# Altium PCB PCB_2020-11-19_18-02-21_2026-10-13.pcbdoc (part 2 of 2)
Units mm, origin at the board's own origin, x right, y up, seen from the top; angles counter-clockwise.
Board outline 104.82 x 112.39 mm, 2 copper layers (Top Layer, Bottom Layer); 188 components, 189 nets, 651 pads, 163 vias.
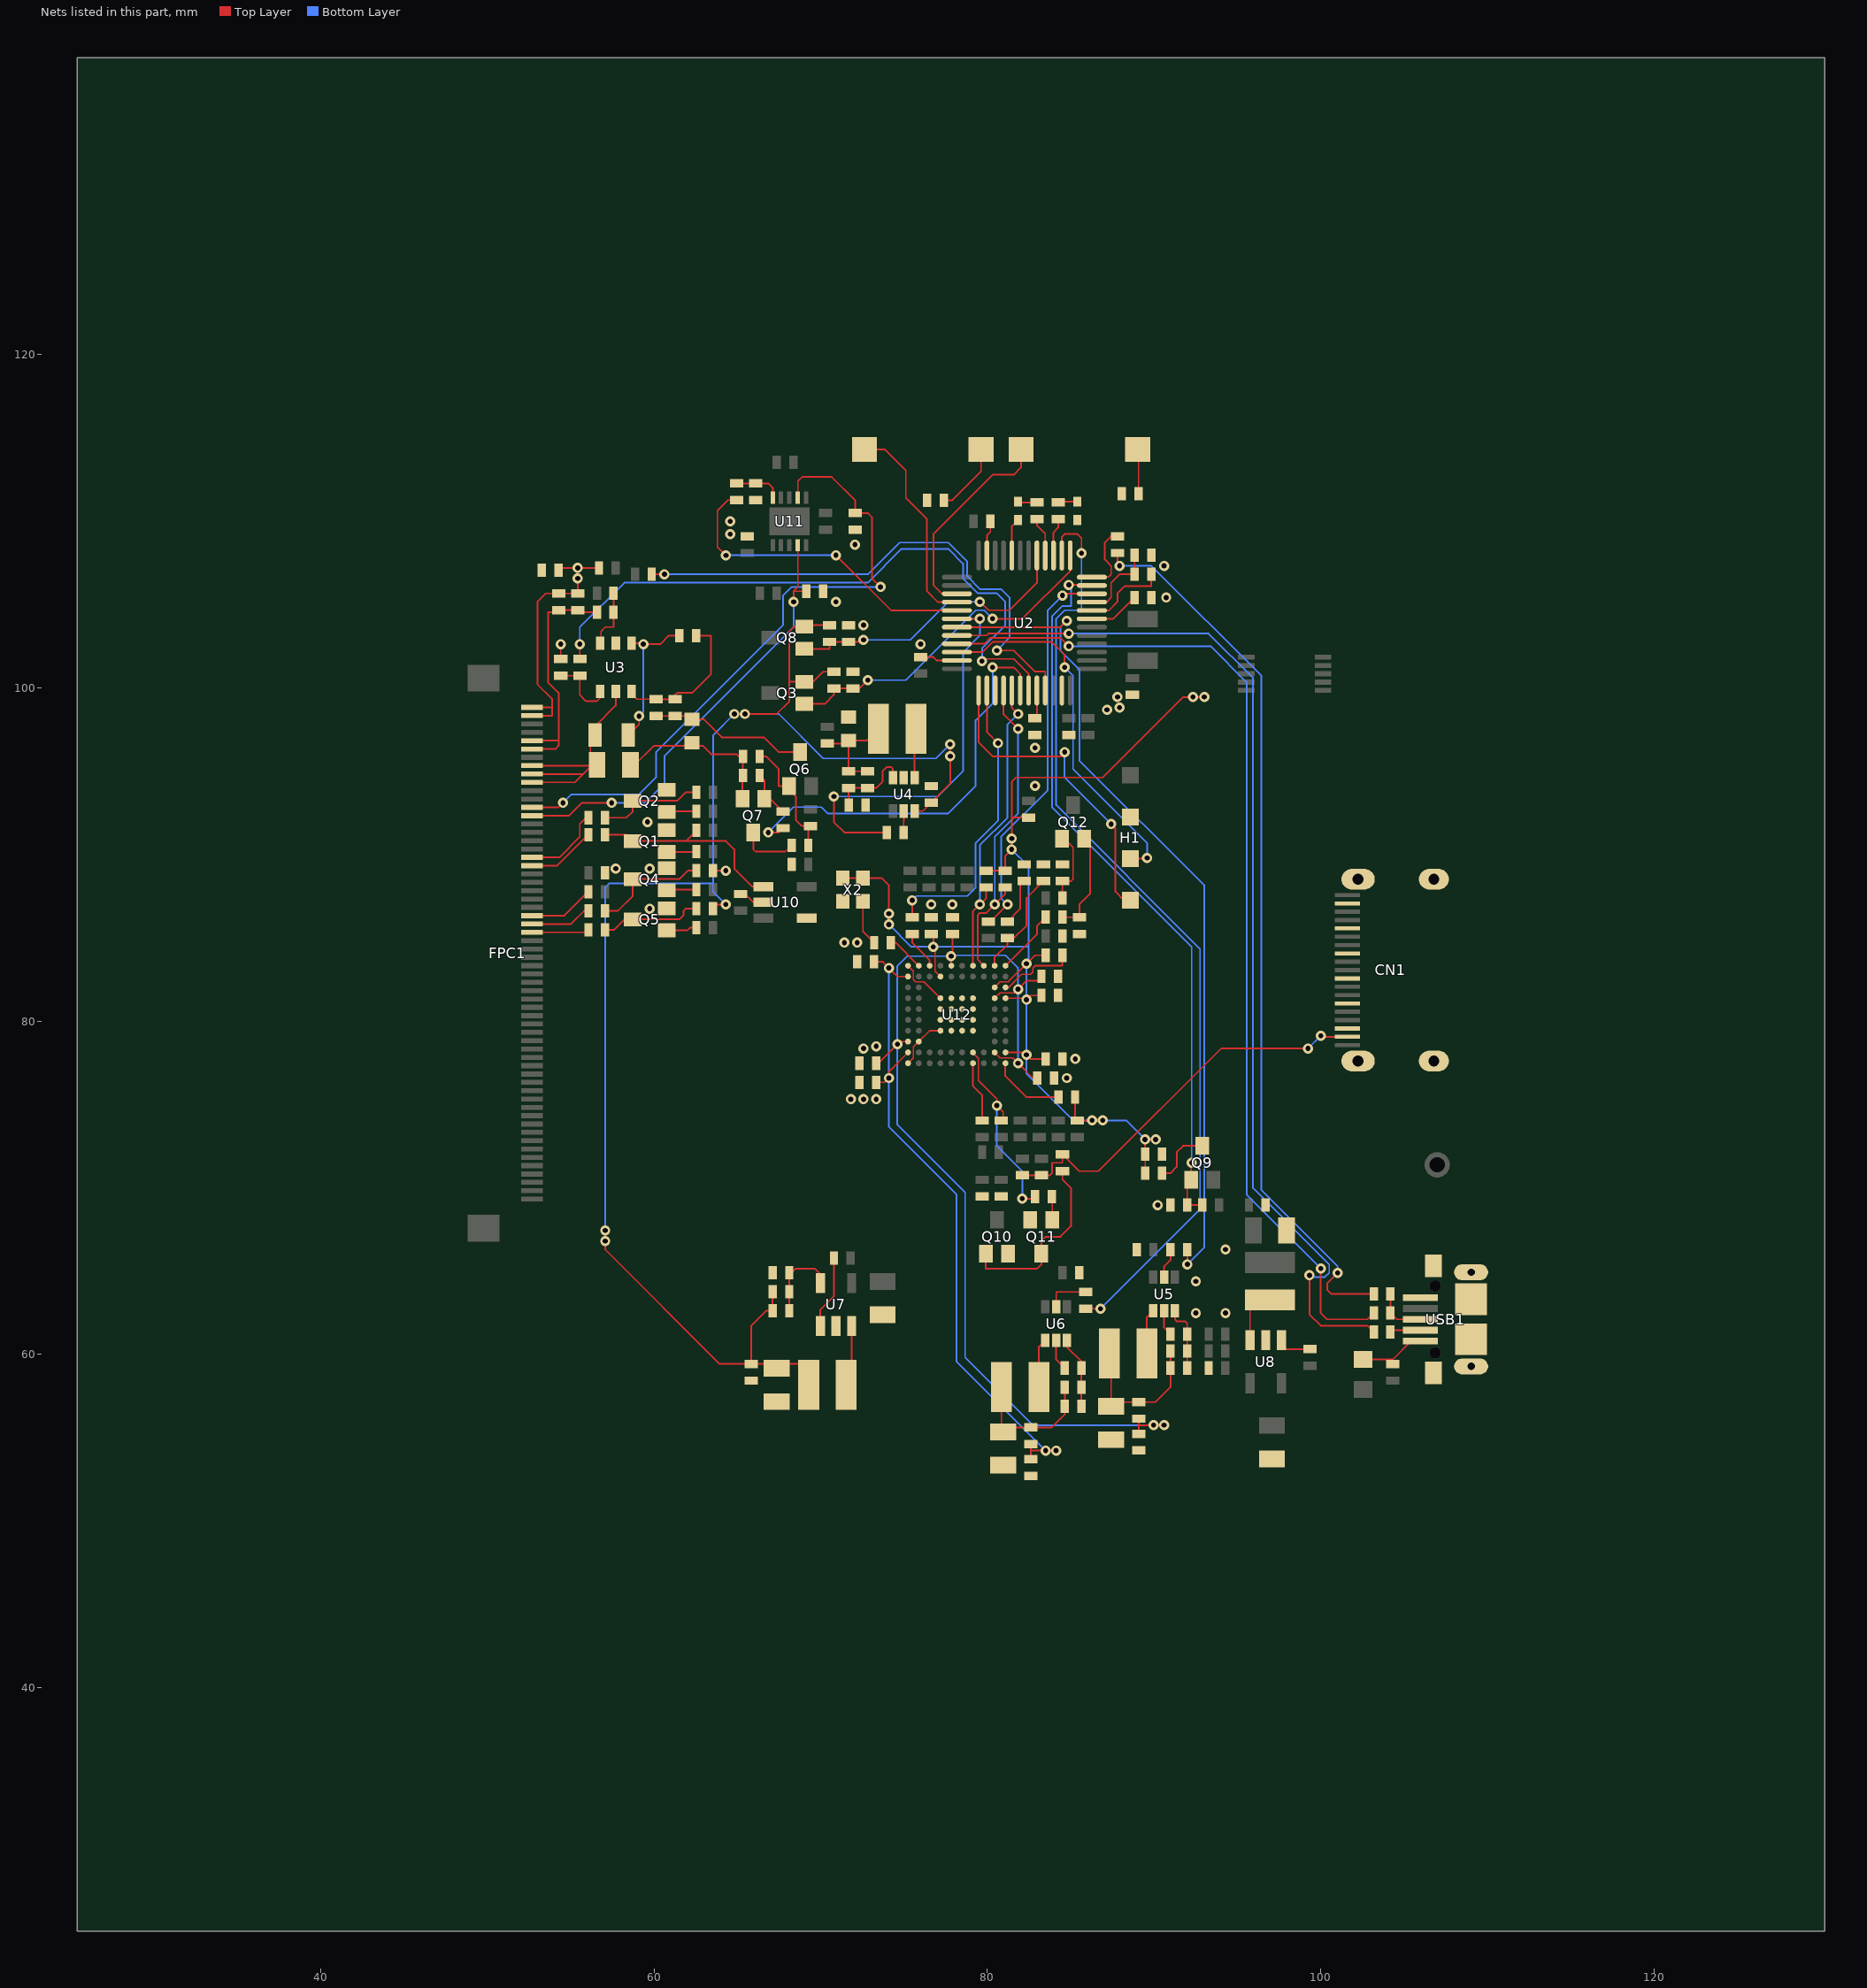
[diagram p2: the nets of this part, all layers, seen from the top]

## Via types
v1: diameter 0.61, hole 0.305, Top Layer to Bottom Layer, tented both sides, 159 vias
v2: diameter 0.5, hole 0.201, Top Layer to Bottom Layer, tented both sides, 4 vias

## Nets (pads, with @x,y where several pads share a name; then routed paths per layer and width w, separated by ;. In a path a pad name is that pad's centre, name@x,y a point inside that pad or via, vN(x,y) a via of type N, cw(c..) or ccw(c..) an arc to the next point about the centre after c; other vN are vias at no path point) (continued)
DISP33: C6.1 C28.1 C29.1 C30.1 L9.2 Q3.2 Q8.2 R8.1 R12.1 R13.1 R33.2 R41.2 U4.3 | length 97.9
  Top Layer w0.1: v1(57.073,67.437) v1(57.073,66.802) 57.073,66.294 63.939,59.428 C30.1@65.836,59.428 ; R13.1@63.542,86.741 63.542,86.995 v1(64.312,86.995) ; R12.1@63.542,89.027 v1(64.312,89.027) ; v1(64.82,98.425) v1(65.455,98.425) 67.36,98.425 68.122,99.187 68.122,100.355 ; C28.1@67.114,62.611 R41.2@67.114,63.754 ; C28.1@67.114,62.611 66.725,62.611 65.836,61.722 C30.1@65.836,59.428 ; L9.2@69.283,58.166 69.283,59.436 67.36,59.436 C29.1@67.36,59.166 67.098,59.428 C30.1@65.836,59.428 ; R33.2@70.535,103.751 69.105,103.751 Q8.2@69.011,103.657 68.401,103.657 68.122,103.378 68.122,100.355 ; R8.1@70.789,100.957 70.146,100.957 69.544,100.355 Q3.2@69.011,100.355 68.122,100.355 ; U4.3@75.63,92.598 76.13,92.598 C6.1@76.631,93.099 77.774,94.242 v1(77.774,95.885) v1(77.756,96.604)
  Bottom Layer w0.1: v1(57.073,67.437) 57.073,88.011 57.327,88.265 63.55,88.265 63.55,89.027 v1(64.312,89.027) ; 63.537,89.027 63.537,87.77 v1(64.312,86.995) ; 63.545,89.027 63.545,97.15 v1(64.82,98.425) ; v1(65.455,98.425) 67.487,98.425 70.154,95.758 76.91,95.758 v1(77.756,96.604)
E1: R34.1 U2.31 | length 50.4
  Top Layer w0.1: U2.31@78.169,103.636 84.382,103.636 v1(84.759,104.013) ; R34.1@91.99,66.294 v1(91.998,65.405)
  Bottom Layer w0.1: v1(84.759,104.013) 84.378,103.632 84.378,102.235 85.521,101.092 85.521,95.631 93.014,88.138 93.014,66.421 v1(91.998,65.405)
E2: R39.1 U2.14 | length 56.9
  Top Layer w0.1: U2.14@84.469,107.937 84.469,109.057 84.632,109.22 85.394,109.22 85.648,108.966 v1(85.648,108.077) ; R39.1@85.902,62.746 v1(86.791,62.738)
  Bottom Layer w0.1: v1(85.648,108.077) 85.648,104.648 84.632,104.648 84.124,104.14 84.124,92.964 92.76,84.328 92.76,68.707 v1(86.791,62.738)
E3: C35.1 Q9.1 R46.1 U2.11 | length 43.9
  Top Layer w0.1: v1(84.886,106.172) 86.233,106.172 U2.11@86.269,106.136 ; v1(92.252,71.501) 92.227,71.476 Q9.1@92.227,70.485 91.99,70.248 91.99,68.961 R46.1@92.895,68.961
  Bottom Layer w0.1: v1(84.886,106.172) 85.013,106.045 85.013,104.902 84.505,104.902 83.87,104.267 83.87,92.837 92.252,84.455 v1(92.252,71.501)
E4: R18.2 U2.30 | length 24.3
  Top Layer w0.1: v1(70.789,93.472) 70.789,91.948 71.424,91.313 R18.2@73.972,91.313 ; U2.30@78.169,104.136 78.173,104.14 v1(79.552,104.14)
  Bottom Layer w0.1: v1(70.789,93.472) 77.012,93.472 78.536,94.996 78.536,102.108 79.552,103.124 v1(79.552,104.14)
E5: R30.2 U2.42 | length 25.3
  Top Layer w0.1: v1(66.852,91.313) 67.479,91.313 R30.2@67.741,91.575 ; v1(80.314,101.219) 81.584,101.219 81.969,100.834 U2.42@81.969,99.836
  Bottom Layer w0.1: v1(66.852,91.313) 68.376,92.837 70.027,92.837 70.408,92.456 77.647,92.456 79.298,94.107 79.298,98.044 80.314,99.06 v1(80.314,101.219)
E6: C3.1 Q3.1 R8.2 U2.13 | length 20.8
  Top Layer w0.1: Q3.1@69.011,99.035 70.256,99.035 70.789,99.568 R8.2@70.789,99.957 C3.1@71.932,99.957 72.321,99.957 v1(72.821,100.457) ; v1(80.314,104.14) 82.092,104.14 84.969,107.017 U2.13@84.969,107.936
  Bottom Layer w0.1: v1(72.821,100.457) 75.107,100.457 79.298,104.648 79.806,104.648 v1(80.314,104.14)
E7: C18.1 Q8.1 R33.1 U2.17 | length 17.9
  Top Layer w0.1: Q8.1@69.011,102.337 70.535,102.337 R33.1@70.535,102.751 C18.1@71.678,102.751 72.448,102.751 v1(72.567,102.87) ; v1(79.552,105.156) 80.06,104.648 81.33,104.648 82.968,106.286 U2.17@82.968,107.937
  Bottom Layer w0.1: v1(72.567,102.87) 75.361,102.87 77.647,105.156 v1(79.552,105.156)
E8: R25.2 U2.43 | length 39.6
  Top Layer w0.1: R25.2@55.549,101.719 v1(55.549,102.616) ; v1(79.679,101.6) 79.806,101.727 81.584,101.727 82.468,100.843 U2.43@82.468,99.835
  Bottom Layer w0.1: v1(55.549,102.616) 55.549,103.632 58.216,106.299 72.821,106.299 74.853,108.331 77.647,108.331 78.536,107.442 78.536,106.553 79.425,105.664 80.568,105.664 81.076,105.156 81.076,103.759 79.679,102.362 v1(79.679,101.6)
E9: R22.2 U2.45 | length 32.2
  Top Layer w0.1: R22.2@59.859,106.807 v1(60.629,106.807) ; v1(80.568,102.235) 81.584,102.235 82.854,100.965 83.469,100.965 U2.45@83.469,99.835
  Bottom Layer w0.1: v1(60.629,106.807) 72.821,106.807 74.726,108.712 77.647,108.712 78.79,107.569 78.79,106.68 79.552,105.918 80.822,105.918 81.33,105.41 81.33,102.997 v1(80.568,102.235)
E10: R31.2 U2.29 | length 19.5
  Top Layer w0.1: v1(64.316,107.944) 63.804,108.457 63.804,110.617 64.447,111.26 R31.2@64.947,111.26 ; v1(70.916,107.95) 74.23,104.636 U2.29@78.169,104.636
  Bottom Layer w0.1: v1@64.317,107.945 v1(70.916,107.95)
F1_1: C66.1 F1.1 USB1.1 | length 4.4
  Top Layer w0.1: C66.1@102.539,59.701 104.317,59.7 F1.1@104.317,59.428 104.317,59.69 105.43,60.803 USB1.1@105.968,60.803
FB1: C7.2 FPC1.1 FPC1.2 R21.1 R23.1 R24.2 | length 16.3
  Top Layer w0.1: FPC1.2@52.681,98.324 53.898,98.323 53.898,99.314 53.009,100.203 53.009,105.156 53.509,105.656 R21.1@54.279,105.656 R23.1@55.422,105.656 v1(55.422,106.553) v1(55.422,107.188) ; FPC1.1@52.681,98.824 53.898,98.824 ; R24.2@54.271,107.061 54.398,107.188 v1(55.422,107.188) ; C7.2@56.7,107.188 v1(55.422,107.188)
FB2: FPC1.5 FPC1.6 R19.1 R21.2 R23.2 | length 14.6
  Top Layer w0.1: FPC1.6@52.681,96.324 54.083,96.324 54.279,96.52 54.279,99.695 53.644,100.33 53.644,104.521 54.144,104.521 R21.2@54.279,104.656 R23.2@55.422,104.656 55.557,104.521 R19.1@56.573,104.521 ; FPC1.5@52.681,96.824 54.279,96.825
GND: C1.2 C2.2 C3.2 C4.2 C6.2 C8.2 C9.2 C10.2 C11.2 C13.2 C16.2 C17.2 C18.2 C19.2 C21.2 C22.2 C23.2 C24.2 C26.2 C27.2 C29.2 C30.2 C31.2 C32.2 C34.2 C35.2 C36.2 C37.2 C38.2 C39.2 C40.2 C41.2 C42.2 C43.2 C44.2 C45.2 C47.1 C48.2 C49.2 C51.2 C52.2 C53.2 C59.2 C60.2 C61.2 C62.2 C63.2 C64.2 C65.2 CN1.2 CN1.5 CN1.8 CN1.11 CN1.14 CN1.17 CN1.20 CN1.21 CN1.22 CN1.23 H1.3 LED1.1 LED2.1 Q1.2 Q2.2 Q4.2 Q5.2 Q7.2 Q10.2 Q11.2 R17.2 R24.1 R26.1 R32.1 R36.1 R37.1 R42.1 R43.1 R59.1 R67.2 R68.1 R70.1 R71.1 U2.8 U2.20 U2.23 U2.35 U2.39 U2.47 U3.2 U4.5 U5.5 U6.5 U7.2 U8.2 U10.4 U12.A10 U12.C9 U12.D4 U12.D5 U12.D6 U12.D7 U12.E4 U12.E5 U12.E6 U12.E7 U12.F4 U12.F5 U12.F6 U12.F7 U12.G4 U12.G5 U12.G6 U12.G7 U12.H1 U12.K10 USB1.5 USB1.SH1 USB1.SH2 USB1.SH3 USB1.SH4 USB1.SH5 USB1.SH6 X2.2 | length 37.2
  Top Layer w0.07: U12.A10@75.236,77.47 75.558,77.792 75.558,78.442 U12.C9@75.886,78.77 ; U12.K10@75.236,83.32 75.549,82.997 75.549,82.494 75.689,82.352 76.202,82.352 U12.G7@77.187,81.369
  Top Layer w0.1: R26.1@54.406,101.719 v1(54.406,102.616) ; C8.2@58.582,95.377 58.851,95.377 59.994,96.52 62.915,96.52 63.423,96.012 64.947,96.012 65.074,95.885 C10.2@65.336,95.885 ; C10.2@65.278,95.885 65.336,95.827 C11.2@65.336,94.742 65.303,94.709 Q7.2@65.303,93.345 ; U12.C9@75.887,78.77 76.537,79.421 U12.D7@77.187,79.421 ; C49.2@75.996,101.846 76.766,101.846 76.976,101.636 U2.35@78.17,101.636 ; U2.23@79.969,107.937 79.969,109.129 80.179,109.339 C47.1@80.179,109.982 ; U12.H1@81.086,82.02 81.264,82.019 82.049,82.804 82.6,82.804 82.727,82.931 82.727,83.185 82.862,83.32 84.497,83.32 C44.2@84.497,83.947 ; U2.20@81.469,107.936 81.469,109.698 LED2.1@81.838,110.067 ; U6.5@84.123,60.85 84.123,59.699 R37.1@84.64,59.182 ; U2.8@86.269,104.636 87.286,104.635 87.807,105.156 87.807,105.664 88.246,106.103 89.831,106.103 C64.2@89.831,106.807 ; U5.5@90.6,62.628 90.6,61.604 R36.1@90.99,61.214
  other v1: 92.506,62.484 94.284,62.484 92.506,64.389 94.284,66.294 90.22,68.961 71.805,75.311 72.567,75.311 73.329,75.311 84.759,76.581 85.267,77.724 72.567,78.359 73.329,78.486 71.424,84.709 72.186,84.709 59.74,86.741 76.631,86.995 77.901,86.995 57.708,89.154 59.74,89.154 59.613,91.948 82.854,94.107 82.854,96.393 87.172,98.679 87.934,98.806 87.807,99.441 75.996,102.616 72.567,103.759 70.916,105.156 90.728,105.41 90.601,107.315 72.059,108.585 64.566,109.22 64.566,109.982
HPD0: R56.2 R60.1 U12.B4 | length 11.9
  Top Layer w0.07: U12.B4@79.125,78.12 79.448,77.772 79.448,76.431 80.568,75.311 v1(80.568,74.93)
  Top Layer w0.1: v1(80.568,74.93) 80.949,74.549 80.949,74.16 R60.1@80.822,74.033 ; v1(82.092,69.342) 82.735,69.342 R56.2@82.862,69.469
  Bottom Layer w0.1: v1(80.568,74.93) 80.568,72.517 82.092,70.993 v1(82.092,69.342)
HPD1: R58.2 U12.A4 | length 3.7
  Top Layer w0.1: U12.A4@79.126,77.47 79.126,76.118 79.679,75.565 R58.2@79.679,74.033
I2C_SCL: R62.1 U2.41 U12.K4 | length 19
  Top Layer w0.1: U12.K4@79.125,83.32 79.125,86.568 v1(79.552,86.995) 79.933,87.376 R62.1@79.933,88.019 ; U2.41@81.469,99.836 81.469,98.794 v1(81.838,98.425)
  Bottom Layer w0.1: v1(79.552,86.995) 79.552,90.551 81.203,92.202 81.203,97.79 v1(81.838,98.425)
I2C_SDA: R61.1 U2.40 U12.K3 | length 19.5
  Top Layer w0.1: U12.K3@79.786,83.32 79.425,83.68 79.425,86.36 79.552,86.487 79.93,86.487 v1(80.441,86.995) 81.076,87.63 R61.1@81.076,88.019 ; U2.40@80.969,99.836 80.969,98.405 v1(81.838,97.536)
  Bottom Layer w0.1: v1(80.441,86.995) 80.441,91.059 81.838,92.456 v1(81.838,97.536)
INT: C50.2 U2.10 | length 23.6
  Top Layer w0.1: C50.2@80.06,85.971 80.179,85.971 v1(81.203,86.995) ; v1(84.505,105.537) 84.604,105.636 U2.10@86.269,105.636
  Bottom Layer w0.1: v1(81.203,86.995) 80.822,87.376 80.822,91.059 83.616,93.853 83.616,104.648 v1(84.505,105.537)
L2_1: C4.1 C5.1 L1.2 L2.1 R16.1 | length 6.4
  Top Layer w0.1: L1.2@70.408,96.655 71.497,96.655 C4.1@71.678,96.836 ; C5.1@72.821,94.988 R16.1@71.678,94.988 C4.1@71.678,96.836 ; L2.1@73.474,97.536 72.774,96.836 C4.1@71.678,96.836
L3_1: D1.2 L3.1 U3.1 | length 8.9
  Top Layer w0.1: D1.2@58.454,97.155 59.105,97.806 v1(59.105,98.298) ; U3.1@58.658,102.667 59.308,102.667 v1(59.359,102.616) 60.375,102.616 60.883,103.124 L3.1@61.526,103.124
  Bottom Layer w0.1: v1(59.105,98.298) 59.359,98.552 v1(59.359,102.616)
L5_1: L5.1 U5.4 | length 2.7
  Top Layer w0.1: L5.1@89.567,60.071 89.567,62.245 U5.4@89.949,62.628
L6_1: C20.2 C21.1 L5.2 L6.1 R35.1 | length 9.4
  Top Layer w0.1: L5.2@87.317,60.071 87.426,59.962 C21.1@87.426,56.88 87.688,57.142 L6.1@89.077,57.142 90.085,57.142 90.99,58.047 R35.1@90.99,59.182 ; R35.1@90.99,59.182 C20.2@90.99,60.198
L8_2: C24.1 C25.2 L7.1 L8.2 R38.1 | length 8.6
  Top Layer w0.1: L8.2@80.84,58.039 80.84,55.357 C24.1@80.949,55.356 ; C24.1@80.949,55.356 81.211,55.618 L7.1@82.6,55.618 83.862,55.618 84.64,56.396 R38.1@84.64,56.896 ; R38.1@84.64,56.896 C25.2@84.64,58.039
L10_1: L10.1 U8.3 | length 3.6
  Top Layer w0.1: U8.3@95.757,60.858 95.757,63.264 L10.1@96.951,63.264
LED2_2: LED2.2 R73.2 | length 1.2
  Top Layer w0.1: LED2.2@81.838,111.167 81.888,111.117 R73.2@82.981,111.117
PCKIN: C46.2 U12.K1 | length 3.9
  Top Layer w0.1: U12.K1@81.076,83.32 82.981,85.225 82.981,85.717 C46.2@83.497,86.233
PFIL: C48.1 R66.1 U12.K2 | length 6.5
  Top Layer w0.1: U12.K2@80.426,83.32 80.426,83.805 81.203,84.582 R66.1@81.203,84.963 ; R66.1@81.203,84.971 81.592,84.971 82.346,85.725 82.346,87.384 C48.1@83.362,88.4
PWR: CN1.18 R51.1 R54.1 R55.2 | length 24.5
  Top Layer w0.1: R51.1@82.092,70.747 R54.1@83.235,70.747 ; R54.1@83.235,70.739 83.743,70.739 83.87,70.866 83.87,71.501 84.505,71.501 R55.2@84.505,72.001 85.513,70.993 86.664,70.993 94.03,78.359 v1(99.237,78.359) ; v1(99.999,79.121) 100.062,79.058 CN1.18@101.59,79.058
  Bottom Layer w0.1: v1(99.237,78.359) v1(99.999,79.121)
Q4_1: Q4.1 R14.1 | length 1.8
  Top Layer w0.1: Q4.1@60.756,87.859 60.756,87.884 R14.1@62.542,87.884
Q4_3: Q4.3 R10.2 R12.2 | length 7.1
  Top Layer w0.1: R10.2@57.065,86.614 57.835,86.614 58.724,87.503 Q4.3@58.724,88.519 61.518,88.519 62.026,89.027 R12.2@62.542,89.027
Q5_1: Q5.1 R15.1 | length 1.8
  Top Layer w0.1: Q5.1@60.756,85.446 62.001,85.446 62.153,85.598 R15.1@62.542,85.598
Q5_3: Q5.3 R11.2 R13.2 | length 6.2
  Top Layer w0.1: R11.2@57.065,85.471 57.581,85.471 58.216,86.106 Q5.3@58.724,86.106 61.518,86.106 61.772,86.36 61.772,86.614 61.899,86.741 R13.2@62.542,86.741
Q6_3: C9.1 L4.2 Q6.3 R27.2 | length 9.5
  Top Layer w0.1: R27.2@60.121,98.306 L4.2@61.264,98.306 62.084,98.306 C9.1@62.281,98.109 62.977,98.109 64.058,97.028 66.598,97.028 67.487,96.139 Q6.3@68.757,96.139
Q7_3: Q7.3 R29.2 | length 3.5
  Top Layer w0.1: Q7.3@65.963,91.313 65.963,90.297 66.09,90.17 67.876,90.17 R29.2@68.257,90.551
Q10_1: Q10.1 Q11.3 R55.1 | length 11.4
  Top Layer w0.1: Q10.1@79.908,66.039 79.908,65.151 82.981,65.151 83.235,65.405 Q11.3@83.235,66.04 83.235,66.802 83.489,67.056 84.378,67.056 85.013,67.691 85.013,69.977 84.505,70.485 R55.1@84.505,71.001
Q11_1: Q11.1 R56.1 | length 1.4
  Top Layer w0.1: R56.1@83.862,69.469 83.895,69.435 Q11.1@83.895,68.072
R1_1: FPC1.19 R1.1 | length 4.8
  Top Layer w0.1: FPC1.19@52.681,89.824 54.315,89.825 55.549,91.059 55.549,91.821 55.93,92.202 R1.1@56.065,92.202
R2_1: FPC1.20 R2.1 | length 4.2
  Top Layer w0.1: FPC1.20@52.681,89.324 54.195,89.324 56.057,91.186 R2.1@56.065,91.186
R3_2: Q2.3 R1.2 R3.2 | length 6.5
  Top Layer w0.1: R1.2@57.065,92.202 58.343,92.202 58.724,92.583 Q2.3@58.724,93.218 61.391,93.218 61.899,93.726 R3.2@62.542,93.726
R4_2: Q1.3 R2.2 R4.2 U10.1 | length 12.7
  Top Layer w0.1: R2.2@57.065,91.186 58.343,91.186 Q1.3@58.724,90.805 61.907,90.805 R4.2@62.542,91.44 ; 61.653,90.805 64.312,90.805 64.82,90.297 64.82,89.154 65.902,88.072 U10.1@66.621,88.072
R5_1: Q2.1 R5.1 | length 1.8
  Top Layer w0.1: Q2.1@60.756,92.558 60.781,92.583 R5.1@62.542,92.583
R6_1: Q1.1 R6.1 | length 1.8
  Top Layer w0.1: Q1.1@60.756,90.145 62.516,90.145 R6.1@62.542,90.17
R7_1: R7.1 U10.2 | length 1.6
  Top Layer w0.1: R7.1@65.201,87.622 65.463,87.622 65.963,87.122 U10.2@66.573,87.122
R9_1: FPC1.26 R9.1 | length 4
  Top Layer w0.1: FPC1.26@52.681,86.324 54.624,86.324 56.057,87.757 R9.1@56.065,87.757
R10_1: FPC1.27 R10.1 | length 3.7
  Top Layer w0.1: FPC1.27@52.681,85.824 55.013,85.824 55.803,86.614 R10.1@56.065,86.614
R11_1: FPC1.28 R11.1 | length 3.4
  Top Layer w0.1: FPC1.28@52.681,85.324 55.918,85.324 R11.1@56.065,85.471
R18_1: R18.1 U4.2 | length 1.3
  Top Layer w0.1: R18.1@74.972,91.313 U4.2@74.98,92.598
R20_2: R19.2 R20.2 U3.3 | length 3.6
  Top Layer w0.1: U3.3@56.758,102.667 56.819,102.728 56.819,103.378 57.073,103.632 57.573,103.64 57.573,104.521 R20.2@57.573,105.664
R26_2: R25.1 R26.2 U3.4 | length 4.1
  Top Layer w0.1: R26.2@54.406,100.719 R25.1@55.549,100.719 55.549,99.568 55.93,99.187 56.565,99.187 56.758,99.38 U3.4@56.758,99.771
R27_1: L3.2 L4.1 R27.1 U3.6 | length 9
  Top Layer w0.1: U3.6@58.658,99.771 58.658,99.634 58.978,99.314 R27.1@60.121,99.306 L4.1@61.264,99.306 61.264,99.568 61.391,99.695 62.28,99.695 63.423,100.838 63.423,103.124 L3.2@62.526,103.124
R29_1: C10.1 Q6.1 R28.1 R29.1 | length 7.5
  Top Layer w0.1: C10.1@66.336,95.885 66.725,95.885 67.487,95.123 67.487,94.107 Q6.1@68.097,94.107 68.097,93.878 68.503,93.472 68.503,92.075 68.876,91.702 R28.1@69.392,91.702 69.257,91.567 R29.1@69.257,90.551
R30_1: C11.1 Q7.1 R30.1 | length 3
  Top Layer w0.1: C11.1@66.336,94.742 66.623,94.454 Q7.1@66.623,93.345 66.971,93.345 R30.1@67.741,92.575
R32_2: R31.1 R32.2 U11.10 | length 2.9
  Top Layer w0.1: R31.1@64.947,112.26 R32.2@66.09,112.26 66.86,112.26 67.131,111.989 U11.10@67.131,111.404
R34_2: R34.2 U5.2 | length 1.8
  Top Layer w0.1: U5.2@90.601,64.628 90.601,65.278 90.99,65.667 R34.2@90.99,66.294
R36_2: C20.1 R35.2 R36.2 U5.6 | length 4.1
  Top Layer w0.1: U5.6@91.25,62.628 91.249,62.116 91.363,61.976 91.871,61.976 91.99,61.857 91.99,61.214 C20.1@91.99,60.16 ; R35.2@91.99,59.182 C20.1@91.99,60.198
R45_2: R45.2 U8.1 | length 2.3
  Top Layer w0.1: U8.1@97.637,60.858 97.637,60.317 R45.2@99.364,60.317
R47_2: Q9.3 R47.2 | length 3.6
  Top Layer w0.1: R47.2@90.466,70.866 90.982,70.866 91.363,71.247 91.363,72.136 91.744,72.517 Q9.3@92.887,72.517
R63_1: R63.1 U12.K8 | length 2.3
  Top Layer w0.1: R63.1@75.488,85.225 75.488,84.709 76.526,83.671 U12.K8@76.526,83.32
R64_1: R64.1 U12.K9 | length 2.2
  Top Layer w0.1: R64.1@74.21,84.709 74.487,84.709 U12.K9@75.876,83.32
R64_2: R64.2 X2.3 | length 2.8
  Top Layer w0.1: X2.3@72.532,87.184 72.531,85.387 R64.2@73.21,84.709
R65_2: C52.1 Q12.1 R65.2 | length 4.5
  Top Layer w0.1: Q12.1@84.48,90.932 84.632,90.932 85.14,90.424 85.14,88.519 85.021,88.4 C52.1@84.505,88.4 R65.2@84.497,87.376
R66_2: C53.1 R66.2 | length 2.8
  Top Layer w0.1: R66.2@81.203,85.971 81.965,86.733 81.965,88.146 C53.1@82.219,88.4
R67_1: C46.1 Q12.2 R67.1 | length 6.1
  Top Layer w0.1: C46.1@84.497,86.233 R67.1@85.521,86.225 85.521,86.995 86.156,87.63 86.156,90.576 Q12.2@85.8,90.932
R72_2: LED1.2 R72.2 | length 1.2
  Top Layer w0.1: R72.2@84.251,111.117 84.301,111.167 LED1.2@85.394,111.167
R75_1: R74.1 R75.1 USB1.3 | length 3.1
  Top Layer w0.1: R75.1@104.182,63.627 104.182,62.484 104.563,62.103 USB1.3@105.967,62.103
R76_1: R76.1 USB1.2 | length 1.8
  Top Layer w0.1: R76.1@104.182,61.341 104.294,61.453 USB1.2@105.967,61.453
RESETN: R63.2 U2.38 | length 17.8
  Top Layer w0.1: R63.2@75.488,86.225 v1(75.488,87.249) ; U2.38@79.969,99.836 79.969,97.342 v1(80.638,96.673)
  Bottom Layer w0.1: v1(75.488,87.249) 75.742,87.503 78.79,87.503 79.298,88.011 79.298,90.678 80.638,92.018 v1(80.638,96.673)
REXT: R50.2 U12.A1 | length 4.3
  Top Layer w0.1: U12.A1@81.076,77.47 81.076,76.708 82.346,75.438 R50.2@84.124,75.438
S$68: 
S$5815: 
S$40008: 
S$40012: 
S$40015: 
S$40018: 
S$40021: 
S$40024: 
S$40027: 
S$40031: 
S$40034: 
S$40036: 
S$40039: 
S$40042: 
S$40045: 
S$40048: 
S$40051: 
S$40053: 
S$40055: 
S$40057: 
S$40059: 
SCLKTESTPAD: H1.1 U2.37 | length 19.5
  Top Layer w0.1: U2.37@79.468,99.835 79.468,96.731 80.314,95.885 84.378,95.885 v1(84.632,96.139) ; v1(87.426,91.821) 87.68,91.567 87.68,87.757 88.188,87.249 H1.1@88.569,87.249
  Bottom Layer w0.1: v1(84.632,96.139) 84.632,94.615 v1(87.426,91.821)
SDIOTESTPAD: H1.2 U2.34 | length 22.3
  Top Layer w0.1: U2.34@78.17,102.136 79.707,102.136 80.314,102.743 83.87,102.743 84.632,101.981 v1(84.632,101.219) ; H1.2@88.569,89.749 89.545,89.749 v1(89.585,89.789)
  Bottom Layer w0.1: v1(84.632,101.219) 85.14,100.711 85.14,95.123 89.585,90.678 v1(89.585,89.789)
SW1_2: R70.2 SW1.2 | length 4.3
  Top Layer w0.1: R70.2@77.385,111.252 77.901,111.252 79.623,112.974 SW1.2@79.623,114.3
SW2_2: R71.2 SW2.2 | length 2.7
  Top Layer w0.1: SW2.2@89.021,114.3 89.069,114.252 R71.2@89.069,111.633
U2_7: C62.1 U2.7 | length 3.1
  Top Layer w0.1: U2.7@86.269,104.136 87.556,104.135 C62.1@88.831,105.41
U2_9: C63.1 C64.1 U2.9 | length 4.9
  Top Layer w0.1: U2.9@86.269,105.136 87.152,105.136 87.426,105.41 87.426,106.299 87.934,106.807 C64.1@88.831,106.807 ; C64.1@88.831,106.807 C63.1@88.831,107.95
U2_12: R69.1 U2.12 | length 4.2
  Top Layer w0.1: U2.12@86.269,106.636 87.256,106.637 87.426,106.807 87.426,107.315 87.045,107.696 87.045,108.712 87.418,109.085 R69.1@87.807,109.085
U2_15: R72.1 U2.15 | length 2.3
  Top Layer w0.1: U2.15@83.969,107.937 83.969,109.319 84.251,109.601 R72.1@84.251,110.117
U2_16: R73.1 U2.16 | length 2.4
  Top Layer w0.1: R73.1@82.981,110.117 82.981,109.728 83.469,109.24 U2.16@83.469,107.937
U2_27: SW2.1 U2.27 | length 12.7
  Top Layer w0.1: U2.27@78.17,105.636 77.294,105.636 76.758,106.172 76.758,109.22 80.314,112.776 81.584,112.776 82.021,113.213 SW2.1@82.021,114.3
U2_28: SW1.1 U2.28 | length 12.8
  Top Layer w0.1: SW1.1@72.623,114.3 73.837,114.3 75.107,113.03 75.107,111.379 76.377,110.109 76.377,105.791 77.032,105.136 U2.28@78.169,105.136
U2_44: R68.2 U2.44 | length 1.8
  Top Layer w0.1: R68.2@82.854,98.163 82.968,98.163 U2.44@82.968,99.835
U4_4: L2.2 U4.4 | length 3
  Top Layer w0.1: U4.4@75.632,94.598 75.631,97.444 L2.2@75.724,97.536
U4_6: C5.2 R16.2 R17.1 U4.6 | length 5.1
  Top Layer w0.1: R17.1@71.686,92.964 R16.2@71.678,93.988 C5.2@72.821,93.988 73.337,93.988 73.71,94.361 73.71,94.996 73.964,95.25 74.218,95.25 74.332,95.11 U4.6@74.332,94.6
U6_2: R39.2 U6.2 | length 2.7
  Top Layer w0.1: U6.2@84.124,62.85 84.132,63.746 R39.2@85.902,63.746
U6_4: L8.1 U6.4 | length 3
  Top Layer w0.1: L8.1@83.09,58.039 83.09,60.467 U6.4@83.474,60.848
U6_6: C25.1 R37.2 R38.2 U6.6 | length 4.3
  Top Layer w0.1: U6.6@84.773,60.85 84.772,60.439 85.64,59.571 85.64,59.182 C25.1@85.64,58.039 R38.2@85.64,56.896
U7_1: R40.2 U7.1 | length 4.4
  Top Layer w0.1: U7.1@69.976,61.697 69.976,62.687 70.797,63.508 R40.2@70.797,65.786
U7_3: L9.1 U7.3 | length 3.9
  Top Layer w0.1: L9.1@71.533,58.166 71.856,58.166 U7.3@71.856,61.697
U7_5: C28.2 R41.1 R42.2 U7.5 | length 4.9
  Top Layer w0.1: C28.2@68.114,62.611 R41.1@68.114,63.754 68.114,64.897 68.249,64.897 68.503,65.151 69.646,65.151 69.976,64.821 U7.5@69.976,64.287
USB-DM: R76.2 U2.32 | length 64.5
  Top Layer w0.1: U2.32@78.17,103.137 79.946,103.137 80.06,103.251 v1(84.886,103.251) ; v1(99.326,64.744) 99.326,62.395 99.999,61.722 102.801,61.722 R76.2@103.182,61.341
  Bottom Layer w0.1: v1(84.886,103.251) 93.268,103.251 95.935,100.584 95.935,69.977 100.507,65.405 100.507,64.897 100.253,64.643 99.427,64.643 v1(99.326,64.744)
USB-DM2: R69.2 R75.2 | length 54
  Top Layer w0.1: R69.2@87.807,108.085 87.807,107.442 v1(87.934,107.315) ; v1(101.016,64.884) 100.38,64.248 100.38,63.881 100.634,63.627 R75.2@103.182,63.627
  Bottom Layer w0.1: v1(87.934,107.315) 89.839,107.315 96.443,100.711 96.443,69.85 101.015,65.278 v1(101.016,64.884)
USB-DP: R74.2 U2.33 | length 61.8
  Top Layer w0.1: U2.33@78.17,102.636 79.826,102.636 80.187,102.997 84.378,102.997 v1(84.886,102.489) ; v1(99.999,65.151) 99.999,62.484 100.38,62.103 102.801,62.103 R74.2@103.182,62.484
  Bottom Layer w0.1: v1(84.886,102.489) 93.395,102.489 95.554,100.33 95.554,69.596 v1(99.999,65.151)
V1: C13.1 FPC1.13 U11.7 | length 39.7
  Top Layer w0.1: FPC1.13@52.681,92.824 54.266,92.824 v1(54.533,93.091) ; U11.7@68.63,111.404 68.63,112.395 68.884,112.649 70.662,112.649 72.059,111.252 C13.1@72.059,110.482 72.829,110.482 73.075,110.236 73.075,106.553 v1(73.583,106.045)
  Bottom Layer w0.1: v1(54.533,93.091) 55.041,93.599 59.105,93.599 60.121,94.615 60.121,96.139 67.741,103.759 67.741,105.537 68.249,106.045 v1(73.583,106.045)
V2: C17.1 FPC1.14 U11.4 | length 27.1
  Top Layer w0.1: FPC1.14@52.681,92.324 54.909,92.324 55.676,93.091 v1(57.454,93.091) ; v1(68.376,105.156) 68.376,105.791 ; U11.4@68.63,108.56 68.63,106.045 68.376,105.791 ; C17.1@69.146,105.791 68.376,105.791
  Bottom Layer w0.1: v1(57.454,93.091) 59.486,93.091 60.629,94.234 60.629,95.885 68.376,103.632 v1(68.376,105.156)
V3: C8.1 D1.1 FPC1.8 FPC1.9 FPC1.10 U3.5 | length 15.8
  Top Layer w0.1: FPC1.10@52.681,94.324 55.257,94.323 56.184,95.25 56.184,97.155 D1.1@56.454,97.155 ; FPC1.9@52.681,94.824 55.757,94.823 ; FPC1.8@52.681,95.324 C8.1@56.199,95.324 ; D1.1@56.454,97.155 56.454,97.679 57.708,98.933 U3.5@57.708,99.771
VDD11: C22.1 C39.1 C40.1 C42.1 C61.1 L6.2 U12.B2 U12.C10 U12.G2 U12.K6 | length 65.2
  Top Layer w0.07: U12.B2@80.426,78.12 80.764,77.782 81.526,77.782 v1(81.838,77.47) ; U12.G2@80.426,81.369 80.748,81.694 81.617,81.694 v1(81.838,81.915)
  Top Layer w0.1: C40.1@73.321,77.47 73.456,77.47 v1(74.599,78.613) 74.756,78.77 U12.C10@75.226,78.77 ; U12.K6@77.826,83.32 v1(77.826,83.893) 77.901,83.968 C61.1@77.901,85.225 ; v1(81.838,77.47) 82.727,76.581 C39.1@82.989,76.581 ; v1(81.838,81.915) 82.346,82.423 82.989,82.423 C42.1@83.243,82.677 ; C22.1@89.077,55.237 L6.2@89.077,56.142 ; 89.077,55.753 v1(89.966,55.753) v1(90.601,55.753)
  Bottom Layer w0.1: v1(81.838,77.47) v1@81.838,82.061 ; v1(81.838,81.915) 81.838,83.185 81.076,83.947 77.88,83.947 v1(77.826,83.893) 75.18,83.893 74.599,83.312 v1(74.599,78.613) 74.599,73.787 78.663,69.723 78.663,59.817 82.727,55.753 v1(89.966,55.753)
VDD12: C23.1 C41.1 C60.1 L7.2 U12.B10 U12.J10 | length 40.6
  Top Layer w0.1: C60.1@73.194,83.566 73.71,83.566 74.606,82.67 U12.J10@75.226,82.67 ; C41.1@73.321,76.327 73.837,76.327 v1(74.091,76.581) 74.091,76.975 U12.B10@75.236,78.12 ; C23.1@82.6,53.713 L7.2@82.6,54.618 ; 82.6,54.229 v1(83.489,54.229) v1(84.124,54.229)
  Bottom Layer w0.1: v1(74.091,83.185) v1(74.091,76.581) 74.091,73.66 78.155,69.596 78.155,59.563 v1(83.489,54.229)
VDD33: C36.1 C38.1 C43.1 C44.1 C54.2 C59.1 R47.1 R49.2 R50.1 R61.2 R62.2 U12.B1 U12.G1 U12.H2 U12.J7 X2.1 X2.4 | length 75.6
  Top Layer w0.07: v1(76.758,84.455) 76.847,84.366 76.847,82.997 U12.J7@77.177,82.669 ; U12.H2@80.426,82.019 80.748,82.342 81.249,82.342 v1(82.346,83.439)
  Top Layer w0.1: X2.1@71.332,88.584 X2.4@72.532,88.584 73.645,88.584 74.091,88.138 v1(74.091,86.437) v1@74.091,85.725 ; C59.1@76.631,85.225 76.758,85.098 v1(76.758,84.455) ; R62.2@79.933,89.019 R61.2@81.076,89.019 81.076,89.916 v1(81.457,90.297) v1(81.46,90.96) 81.465,92.21 C54.2@82.473,92.21 ; U12.G1@81.076,81.369 82.257,81.369 v1(82.346,81.28) 82.6,81.534 C43.1@83.243,81.534 ; U12.B1@81.086,78.12 82.204,78.12 v1(82.346,77.978) 82.6,77.724 C38.1@83.497,77.724 ; 81.457,92.202 81.457,94.361 81.711,94.615 86.918,94.615 91.744,99.441 92.341,99.441 v1(93.014,99.441) ; v1(82.346,83.439) 82.854,83.947 C44.1@83.497,83.947 ; R50.1@85.259,75.438 85.259,74.168 R49.2@85.394,74.033 v1(86.283,74.041) v1(86.918,74.041) ; C36.1@89.466,72.009 v1(89.458,72.898) v1(90.093,72.898) ; R47.1@89.466,70.866 C36.1@89.466,72.009
  Bottom Layer w0.1: v1(74.091,85.796) 75.432,84.455 v1(76.758,84.455) 82.473,84.455 ; v1(81.457,90.297) 82.473,89.281 82.473,84.455 ; v1(89.458,72.898) 88.315,74.041 v1(86.918,74.041) v1(86.283,74.041) 85.14,74.041 82.346,76.835 v1(82.346,77.978) v1(82.346,81.28) v1(82.346,83.439) 82.473,83.439 82.473,84.455
  other v1: 92.34,99.441
pads on no net: FPC1.3 FPC1.4 FPC1.7 FPC1.11 FPC1.12 FPC1.15 FPC1.16 FPC1.17 FPC1.18 FPC1.21 FPC1.23 FPC1.29 FPC1.30 FPC1.33 FPC1.36 FPC1.39 FPC1.42 FPC1.45 FPC1.48 FPC1.51 FPC1.54 FPC1.57 FPC1.60 FPC1.61 FPC1.62 U1.5 U1.6 U1.7 U1.8 U1.9 U1.10 U2.2 U2.3 U2.4 U2.18 U2.19 U2.26 U4.1 U5.1 U6.1 U10.3 U11.11 U12.J5 U12.J6 U12.J8 USB1. USB1.4
copper on no net:
  other v2: 67.622,109.482 68.622,109.482 67.622,110.482 68.622,110.482

## Polygon pours and split planes (outlines as drawn)
GND on Bottom Layer (solid): 39.674,44.196 39.674,44.577 39.693,44.558 43.992,125.095 113.207,125.095 117.525,120.777 117.525,47.244 108.381,38.1 46.151,38.1 39.693,44.558 39.674,44.196
GND on Top Layer (solid): 45.389,121.666 110.159,121.666 110.413,121.412 110.413,49.022 108.635,47.244 44.373,47.244 43.357,46.228

## Silkscreen, mask and mechanical layers (free items; w line width, h text height)
Bottom Overlay:
  lines w0.1 net S$40008: 96.697,97.663 96.697,100.203 98.221,101.727 100.18,101.727 100.291,101.838
  lines w0.1 net S$40012: 95.173,94.615 95.173,95.885
  lines w0.1 net S$40015: 96.316,94.488 96.316,93.472 96.951,92.837 104.952,92.837 106.349,94.234
  lines w0.1 net S$40018: 98.094,94.615 98.094,96.012
  lines w0.1 net S$40021: 99.11,94.615 99.11,93.599 99.237,93.472 103.682,93.472 104.317,94.107 104.317,94.234
  lines w0.1 net S$40024: 92.506,97.663 93.649,97.663 93.776,97.79 93.776,99.314 94.284,99.822 95.389,99.837 ; 103.174,94.107 103.174,95.377
  lines w0.1 net S$40027: 100.291,99.837 101.142,99.822 101.269,99.695 101.269,97.79
  lines w0.1 net S$40031: 101.904,99.314 101.904,101.346
  lines w0.1 net S$40034: 103.047,98.044 103.047,99.187
  lines w0.1 net S$40036: 103.555,102.997 103.555,102.108 104.698,100.965 104.698,95.631 104.317,95.25
  lines w0.1 net S$40039: 105.206,95.377 105.206,98.044
  lines w0.1 net S$40042: 105.841,97.917 105.841,95.758 106.349,95.25
  lines w0.1 net S$40045: 107.238,96.52 107.238,98.552 107.365,98.679 108.254,98.679 108.508,98.425 108.508,93.091
  lines w0.1 net S$40048: 99.491,97.79 99.11,98.171 99.11,100.076 99.372,100.338 100.291,100.338 ; 107.365,94.107 107.365,95.631 107.873,96.139 107.873,97.917
  lines w0.1 net S$40051: 106.207,93.094 107.365,93.091
  lines w0.1 net S$40053: 109.143,96.647 109.143,98.679 109.778,99.314 110.286,99.314
  lines w0.1 net S$40055: 108.508,103.251 108.508,101.219 109.397,100.33 110.286,100.33
  lines w0.1 net S$40057: 105.333,105.283 105.333,104.14 105.841,103.632 105.841,101.6 106.222,101.219 107.619,101.219 107.873,101.473 107.873,103.251
  lines w0.1 net S$40059: 101.65,110.617 104.063,110.617 106.476,108.204 106.476,107.442 ; 103.428,103.886 104.19,103.886 ; 104.317,105.41 104.317,104.013 104.19,103.886 ; 104.571,101.854 104.571,103.505 104.19,103.886 ; 107.238,101.854 107.238,105.41